# Altium PCB NB3000XN.PcbDoc (part 3 of 71)
Units mil, origin at the board's own origin, x right, y up, seen from the top; angles counter-clockwise.
Board outline 9527.56 x 6929.77 mil, 6 copper layers (Top Layer, GND+SHIELD, MidLayer1, MidLayer2, P2 - 3V3+5V0, Bottom Layer), stack 62.375 mil thick; 832 components, 1027 nets, 4655 pads, 4981 vias.
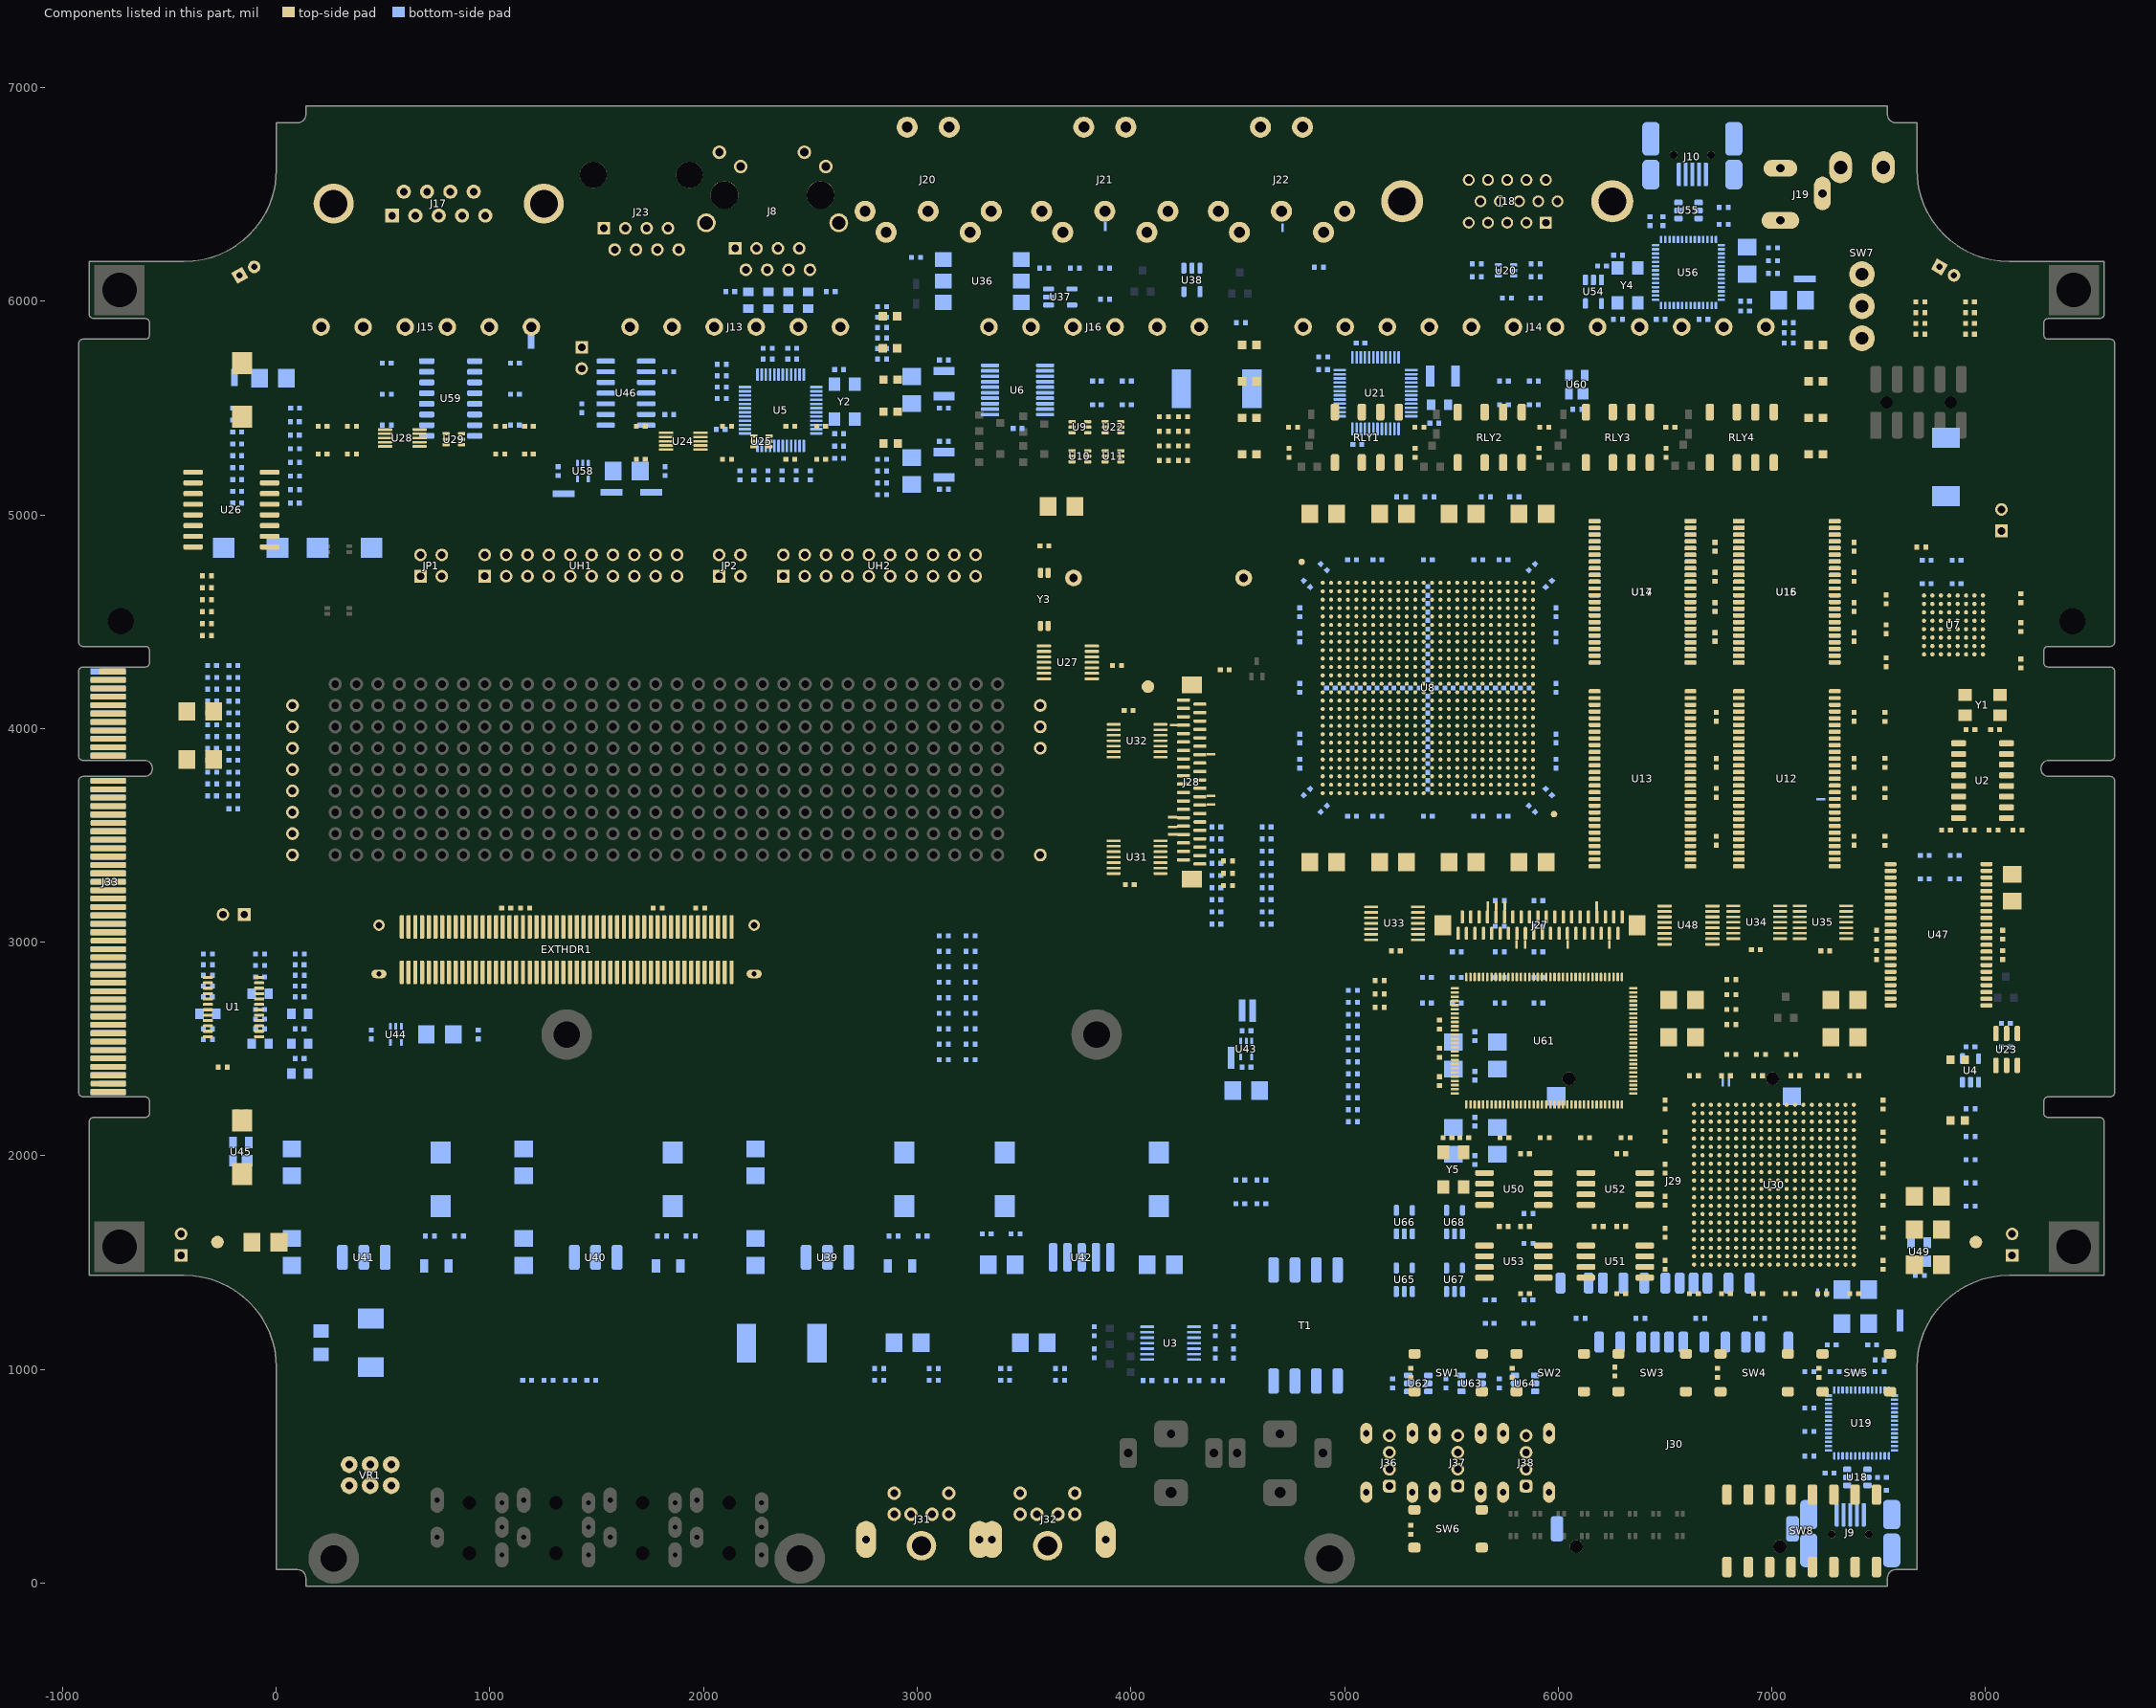
[diagram p7: the components of this part, seen from the top]

## Components (designator, comment, footprint, x,y, rotation, side; value= is the part's Value field where it differs from the comment) (continued)
R228 "100R 1%" RESC1005-STAR 3125,2812.5 r180 bottom locked (schematic designator R13)
R229 "100R 1%" RESC1005-STAR 3125,2667.5 r180 bottom locked (schematic designator R14)
R230 "100R 1%" RESC1005-STAR 3125,2522.5 r180 bottom locked (schematic designator R15)
R231 "100R 1%" RESC1005-STAR 3125,2595 r180 bottom locked (schematic designator R16)
R232 "4K7 1%" RESC1005-STAR 3250,2450 r0 bottom locked (schematic designator R17)
R233 "100R 1%" RESC1005-STAR 3125,2450 r180 bottom locked (schematic designator R18)
R234 "2K2 1%" RESC1005-STAR 1165,3160 r180 top (schematic designator R1)
R235 "2K2 1%" RESC1005-STAR 7530,3474.85 r270 top locked (schematic designator R275)
R236 "4K7 1%" RESC1005-STAR 5040,2719.09 r180 bottom locked (schematic designator R8)
R237 "4K7 1%" RESC1005-STAR 5040,2663.18 r180 bottom locked (schematic designator R7)
R238 "4K7 1%" RESC1005-STAR 5040,2607.27 r180 bottom locked (schematic designator R6)
R239 "4K7 1%" RESC1005-STAR 5040,2551.36 r180 bottom locked (schematic designator R5)
R240 "4K7 1%" RESC1005-STAR 5040,2495.45 r180 bottom locked (schematic designator R4)
R241 "4K7 1%" RESC1005-STAR 5040,2439.55 r180 bottom locked (schematic designator R3)
R242 "4K7 1%" RESC1005-STAR 5040,2383.64 r180 bottom locked (schematic designator R2)
R243 "4K7 1%" RESC1005-STAR 5040,2327.73 r180 bottom locked (schematic designator R1)
R244 "27R 1%" RESC1005-STAR 6280,5915 r180 bottom locked (schematic designator R1)
R245 "2K7 1%" RESC1005-STAR 7080,5805 r180 bottom locked (schematic designator R2)
R246 "5K6 1%" RESC1005-STAR 7080,5852.5 r180 bottom locked (schematic designator R3)
R247 "10K 1%" RESC1005-STAR 6775,6440 r180 bottom locked (schematic designator R4)
R248 "4K7 1%" RESC1005-STAR 7692.5,1440 r180 bottom locked (schematic designator R1000)
R249 "27R 1%" RESC1005-STAR 6775,6360 r180 bottom locked (schematic designator R6)
R250 "4K7 1%" RESC1005-STAR 7005,6250 r180 bottom locked (schematic designator R9)
R251 "4K7 1%" RESC1005-STAR 7005,6130 r180 bottom locked (schematic designator R8)
R252 "4K7 1%" RESC1005-STAR 7005,6190 r0 bottom locked (schematic designator R7)
R253 "4K7 1%" RESC1005-STAR 6665,1240 r180 bottom locked (schematic designator R1)
R254 "4K7 1%" RESC1005-STAR 6105,1240 r180 bottom locked (schematic designator R2)
R255 "4K7 1%" RESC1005-STAR 6385,1240 r0 bottom locked (schematic designator R1)
R256 "4K7 1%" RESC1005-STAR 6945,1240 r0 bottom locked (schematic designator R2)
R257 "12K 1%" RESC1005-STAR 5937.51,2085 r0 top locked (schematic designator R1)
R258 "12K 1%" RESC1005-STAR 6126.25,2085 r0 top locked (schematic designator R2)
R259 "12K 1%" RESC1005-STAR 6315,2085 r0 top locked (schematic designator R3)
R260 "10K 1%" RESC1005-STAR 5040,2775 r180 bottom locked (schematic designator R4)
R261 "150R 1%" RESC1005-STAR 5040,2271.82 r180 bottom locked (schematic designator R5)
R262 "150R 1%" RESC1005-STAR 5040,2215.91 r180 bottom locked (schematic designator R6)
R263 "150R 1%" RESC1005-STAR 5040,2160 r180 bottom locked (schematic designator R7)
R264 "2K2 1%" RESC1005-STAR 6810,2475 r0 top locked (schematic designator R269)
R265 "2K2 1%" RESC1005-STAR 6950,2475 r0 top locked (schematic designator R270)
R266 "2K2 1%" RESC1005-STAR 7090,2475 r0 top locked (schematic designator R271)
R267 "100R 1%" RESC1005-STAR 7926.99,5997 r0 top (schematic designator R154)
R268 "100R 1%" RESC1005-STAR 7695,5997 r0 top (schematic designator R155)
R269 "100R 1%" RESC1005-STAR 7926.99,5846 r0 top (schematic designator R156)
R270 "100R 1%" RESC1005-STAR 7695,5846 r0 top (schematic designator R157)
R271 "4K7 1%" RESC1005-STAR 6090,5495 r180 bottom locked (schematic designator R1000)
R272 "10K 1%" RESC1005-STAR 5445,2482.51 r90 top locked (schematic designator R268)
R273 "10K 1%" RESC1005-STAR 5445,2615 r90 top locked (schematic designator R264)
R274 "10K 1%" RESC1005-STAR 5225,935 r270 bottom locked (schematic designator R265)
R275 "10K 1%" RESC1005-STAR 5475,935 r90 bottom locked (schematic designator R266)
R276 "10K 1%" RESC1005-STAR 5725,935 r270 bottom locked (schematic designator R267)
R277 "4K7 1%" RESC1005-STAR 1785.16,3160.02 r180 top
R278 "4K7 1%" RESC1005-STAR 1985.52,3160.03 r180 top
R279 "4K7 1%" RESC1005-STAR 7926.99,5946.67 r0 top
R280 "4K7 1%" RESC1005-STAR 7695,5946.67 r0 top
R281 "4K7 1%" RESC1005-STAR 7926.99,5896.33 r0 top
R282 "4K7 1%" RESC1005-STAR 7695,5896.33 r0 top
R283 "4K7 1%" RESC1005-STAR 1076.56,3160 r180 top
RLY1 "IMO3 - 5VDC" IM03GR 4955,5245 r270 top locked
RLY2 "IMO3 - 5VDC" IM03GR 5530,5245 r270 top locked (schematic designator RLY1)
RLY3 "IMO3 - 5VDC" IM03GR 6130,5245 r270 top locked (schematic designator RLY1)
RLY4 "IMO3 - 5VDC" IM03GR 6710,5245 r270 top locked (schematic designator RLY1)
SW1 "SPNO" SW_DTSM-61NT/R 5485,985.39 r0 top locked
SW2 "SPNO" SW_DTSM-61NT/R 5962.5,985.39 r0 top locked
SW3 "SPNO" SW_DTSM-61NT/R 6440,985.39 r0 top locked
SW4 "SPNO" SW_DTSM-61NT/R 6917.5,985 r0 top locked
SW5 "SPNO" SW_DTSM-61NT/R 7395,985 r0 top locked
SW6 "SPNO" SW_DTSM-61NT/R 5485,255 r180 top locked (schematic designator SW1)
SW7 "SPDT SUB" T8019L-TNQ 7422,6920 r0 bottom locked (schematic designator SW1)
SW8 "219-8LPST" 219-8LPST 7140,245 r90 top locked (schematic designator SW1)
T1 "PT4812" PT4812 4668,1466 r0 bottom locked
TP1 "GND" TESTPIN 76.12,4108.23 r180 top locked
TP2 "5V0" TESTPIN 76.12,4008.23 r180 top locked
TP3 "+B" TESTPIN 3576.12,3908.23 r0 top locked
TP4 "3V3" TESTPIN 76.12,3908.23 r180 top locked
TP5 "2V5" TESTPIN 76.12,3808.23 r180 top locked
TP6 "1V8" TESTPIN 76.12,3708.23 r180 top locked
TP7 "1V2" TESTPIN 76.12,3608.23 r180 top locked
TP8 "GND" TESTPIN 3576.12,4008.23 r0 top locked
TP9 "MIXER LEFT" TESTPIN 76.12,3508.23 r180 top locked (schematic designator TP1)
TP10 "MIXER RIGHT" TESTPIN 76.12,3408.23 r180 top locked (schematic designator TP2)
TP11 "32K768HZ" TESTPIN 3576.12,4108.23 r0 top locked (schematic designator TP1)
TP12 "VBATT" TESTPIN 3576.12,3408.23 r0 top locked (schematic designator TP15)
U1 "CS4270" TSSOP-24 -320,2835 r270 top locked
U2 "ICS307-02" SOIC127P600-16 7986.38,3756.34 r270 top locked (schematic designator U1)
U3 "74HCU04" TSSOP14 4295,1200 r180 bottom locked (schematic designator U1)
U4 "SN74LVC1G04DBV" SOT95P280-5 7930,2400 r180 bottom locked (schematic designator U1)
U5 "RTL8201CL" TSQFP50P900X900-48 2360.87,5490 r90 bottom locked (schematic designator U1)
U6 "SN74LVC244ADB" SOP65P780-20 3470,5585 r270 bottom locked (schematic designator U2)
U7 "S29GL128P11FFI010" BGA100P8X8-64 7850,4485 r180 top locked (schematic designator U1)
U8 "XC3S1400AN-4FG676C" BGA100P26X26-676 5390,4190 r0 top locked (schematic designator U1)
U9 "SMF05C" SC70_6L 3725,5436.18 r270 top locked (schematic designator U2)
U10 "SMF05C" SC70_6L 3725,5300 r270 top locked (schematic designator U2)
U11 "SMF05C" SC70_6L 3880,5300 r270 top locked (schematic designator U2)
U12 "SDRAM-16Mx16" TSOP80P1176-54 7070,3765 r270 top locked (schematic designator U1)
U13 "SDRAM-16Mx16" TSOP80P1176-54 6395,3765 r270 top locked (schematic designator U2)
U14 "SRAM-256Kx16" TSOP80P1176-44 6395,4640 r270 bottom locked (schematic designator U1_SM)
U15 "SRAM-256Kx16" TSOP80P1176-44 7070,4640 r270 bottom locked (schematic designator U1_SM)
U16 "SRAM-256Kx16" TSOP80P1176-44 7070,4640 r270 top locked (schematic designator U1)
U17 "SRAM-256Kx16" TSOP80P1176-44 6395,4640 r270 top locked (schematic designator U2)
U18 "NUP2201MR6T1G" TSOP95P275-6 7400,495 r90 bottom locked (schematic designator U2)
U19 "CY7C68001-56LFC" QFN50P800X800_HS-57 7420,750 r180 bottom locked (schematic designator U3)
U20 "SMF05C" SC70_6L 5792.17,6170 r270 bottom locked (schematic designator U1)
U21 "THS8134BCPHP" TSQFP50P900X900_HS-48 5145,5570 r180 bottom locked (schematic designator U1)
U22 "SMF05C" SC70_6L 3880,5436.18 r270 top locked (schematic designator U2)
U23 "DS2502P" DSO-C6-D4 8099,2498.01 r180 top locked (schematic designator U1)
U24 "ADC084S021" TSSOP50P490-10AN 1905,5345 r180 top locked (schematic designator U1)
U25 "SMF05C" SC70_6L 2235,5370 r270 top locked (schematic designator U2)
U26 "PT2300-S" SOIC127P1030-16N -210,5025 r0 top locked (schematic designator U1)
U27 "PCF2123TS" TSOP65P640-14AN 3705,4310 r0 top locked (schematic designator U5)
U28 "DAC084S085CIMM" TSSOP50P490-10AN 590,5360 r0 top locked (schematic designator U1)
U29 "SMF05C" SC70_6L 795,5380 r270 top locked (schematic designator U2)
U30 "XC3S400AN-4FGG400C" FGG400 7010,1865 r270 top locked (schematic designator U1)
U31 "74VHC04" TSSOP14 3920,3475 r0 top locked (schematic designator U1)
U32 "74VHC04" TSSOP14 3920,4020 r0 top locked (schematic designator U1)
U33 "74VHC04" TSSOP14 5125,3165 r0 top locked (schematic designator U1)
U34 "74VHC04" TSSOP14 6820,3170 r0 top locked (schematic designator U1)
U35 "74VHC04" TSSOP14 7130,3170 r0 top locked (schematic designator U1)
U36 "4N35S" H11L1SR2VM 3305,6095 r90 bottom locked (schematic designator U1)
U37 "SN74LVC1G04DBV" SOT95P280-5 3670,6020 r90 bottom locked (schematic designator U2)
U38 "SN74LVC1G04DBV" SOT95P280-5 4285.84,6100 r0 bottom locked (schematic designator U3)
U39 "AP1084KL" TO254P-3N 2580,1775 r90 bottom locked (schematic designator U1)
U40 "AP1084KL" TO254P-3N 1495,1775 r90 bottom locked (schematic designator U1)
U41 "AP1084KL" TO254P-3N 410,1775 r90 bottom locked (schematic designator U1)
U42 "NCP630A" TO-263-2 3770,1525 r180 bottom locked (schematic designator U1)
U43 "TC1017R-3.3VLTTR" SOT65P210X80-5N 4540,2500 r270 bottom locked (schematic designator U1)
U44 "TC1017R-3.3VLTTR" SOT65P210X80-5N 560,2568.37 r270 bottom locked (schematic designator U1)
U45 "MAX6315US26D1" SOT143 -165.45,2020 r180 bottom locked (schematic designator U2000)
U46 "ISL8491IB" SOIC127P600-14N 1637.05,5570.08 r180 bottom locked (schematic designator U1)
U47 "SRAM-256Kx16" TSOP80P1176-44 7780,3035 r270 top locked (schematic designator U1_SM)
U48 "XPT2046" TSOP65P640-16AN 6610,3080 r0 top locked (schematic designator U1)
U49 "MAX6315US26D1" SOT143 7689.55,1550 r180 bottom locked (schematic designator U1000)
U50 "M25P80-VMW6 8Mbit Serial Flash" SOIC8-200-BODY 5655,1920 r270 top locked (schematic designator U1)
U51 "M25P80-VMW6 8Mbit Serial Flash" SOIC8-200-BODY 6130,1580 r270 top locked (schematic designator U1)
U52 "M25P80-VMW6 8Mbit Serial Flash" SOIC8-200-BODY 6130,1920 r270 top locked (schematic designator U1)
U53 "M25P80-VMW6 8Mbit Serial Flash" SOIC8-200-BODY 5655,1580 r270 top locked (schematic designator U2)
U54 "SN74LVC1G04DBV" SOT95P280-5 6165,6045 r0 bottom locked (schematic designator U1)
U55 "NUP2201MR6T1G" TSOP95P275-6 6610,6425 r270 bottom locked (schematic designator U2)
U56 "CY7C68001-56LFC" QFN50P800X800_HS-57 6610,6135 r0 bottom locked (schematic designator U3)
U58 "TC1017R-3.3VLTTR" SOT65P210X80-5N 1435,5205 r270 bottom locked (schematic designator U1)
U59 "HIN232ACBNZ-T" SOIC127P600-16 816.8,5545.08 r270 bottom locked (schematic designator U45)
U60 "MAX6315US26D1" SOT143 6087.05,5610 r180 bottom locked (schematic designator U1000)
U61 "ISP1760" SOT425-1 5570,2240 r0 top locked (schematic designator U59)
U62 "NUP2201MR6T1G" TSOP95P275-6 5345,935 r270 bottom locked (schematic designator U60)
U63 "NUP2201MR6T1G" TSOP95P275-6 5595,935 r270 bottom locked (schematic designator U61)
U64 "NUP2201MR6T1G" TSOP95P275-6 5845,935 r270 bottom locked (schematic designator U62)
U65 "SN74LVC1G04DBV" SOT95P280-5 5280,1420 r180 bottom locked
U66 "SN74LVC1G04DBV" SOT95P280-5 5280,1690 r180 bottom locked
U67 "SN74LVC1G04DBV" SOT95P280-5 5515,1420 r180 bottom locked (schematic designator U65)
U68 "SN74LVC1G04DBV" SOT95P280-5 5515,1690 r180 bottom locked (schematic designator U66)
UH1 "2x10 HEADER" HDR2X10 976.12,4713.23 r0 top locked
UH2 "2x10 HEADER" HDR2X10 2373.76,4713.23 r0 top locked
VR1 "2x5K linear" POT-R0911G-A1 440,555 r180 bottom locked
Y1 "20MHZ" XTAL-200X126-4 7986.38,4110 r0 top locked
Y2 "25MHz" XTAL-200X126-4 2660,5530 r270 bottom locked (schematic designator Y1)
Y3 "32.768 kHz 7pF" ECS-71 3595,4605 r90 top locked (schematic designator Y1)
Y4 "24MHz" XTAL-200X126-4 6325,6075 r270 bottom locked (schematic designator Y1)
Y5 "12MHz XTAL" XTAL-200X126-4 5510,1935 r270 top locked (schematic designator Y1)

## Footprints (in the part's own frame and the unit in brackets; to place one, negate y for a bottom-side part, rotate by r counter-clockwise, add the part's x,y. Pads: shape width x height; smd on the part's side, far side on the other; paste and mask are expansions set on the pad)
219-8LPST [mm] "Surface Mount DIP Switch, 8-way, Gull Wing Leads"
  rrect50% 2.44x1.13 smd: 1(-4.3,8.89) 2(-4.3,6.35) 3(-4.3,3.81) 4(-4.3,1.27) 5(-4.3,-1.27) 6(-4.3,-3.81) 7(-4.3,-6.35) 8(-4.3,-8.89) 9(4.3,-8.89) 10(4.3,-6.35) 11(4.3,-3.81) 12(4.3,-1.27) 13(4.3,1.27) 14(4.3,3.81) 15(4.3,6.35) 16(4.3,8.89)
  silkscreen extent -4.42,-11.04 2.68,11.04, body extent -5.1,-11.4 5.08,11.4, height 3.37
0603LED_GREEN [mm]
  rect 1x1 smd paste+0 mask+0: 1(0.85,0) 2(-0.85,0)
  silkscreen extent -1.97,-0.85 1.6,0.85, body extent -0.92,-0.53 1.09,0.53, height 0.46
0603LED_ORANGE [mm]
  rect 1x1 smd paste+0 mask+0: 1(0.85,0) 2(-0.85,0)
  silkscreen extent -1.97,-0.85 1.6,0.85, body extent -0.92,-0.53 1.09,0.53, height 0.46
0603LED_RED [mm]
  rect 1x1 smd paste+0 mask+0: 1(0.85,0) 2(-0.85,0)
  silkscreen extent -1.97,-0.85 1.6,0.85, body extent -0.92,-0.53 1.09,0.53, height 0.46
0603LED_YELLOW [mm]
  rect 1x1 smd paste+0 mask+0: 1(0.85,0) 2(-0.85,0)
  silkscreen extent -1.97,-0.85 1.6,0.85, body extent -0.92,-0.53 1.09,0.53, height 0.46
53751 [mm]
  rrect50% 0.508x2.8 smd: 1(-19.6,-2.7) 2(-19.6,2.7) 3(-18.8,-2.7) 4(-18.8,2.7) 5(-18,-2.7) 6(-18,2.7) 7(-17.2,-2.7) 8(-17.2,2.7) 9(-16.4,-2.7) 10(-16.4,2.7) 11(-15.6,-2.7) 12(-15.6,2.7) 13(-14.8,-2.7) 14(-14.8,2.7) 15(-14,-2.7) 16(-14,2.7) 17(-13.2,-2.7) 18(-13.2,2.7) 19(-12.4,-2.7) 20(-12.4,2.7) 21(-11.6,-2.7) 22(-11.6,2.7) 23(-10.8,-2.7) 24(-10.8,2.7) 25(-10,-2.7) 26(-10,2.7) 27(-9.2,-2.7) 28(-9.2,2.7) 29(-8.4,-2.7) 30(-8.4,2.7) 31(-7.6,-2.7) 32(-7.6,2.7) 33(-6.8,-2.7) 34(-6.8,2.7) 35(-6,-2.7) 36(-6,2.7) 37(-5.2,-2.7) 38(-5.2,2.7) 39(-4.4,-2.7) 40(-4.4,2.7) 41(-3.6,-2.7) 42(-3.6,2.7) 43(-2.8,-2.7) 44(-2.8,2.7) 45(-2,-2.7) 46(-2,2.7) 47(-1.2,-2.7) 48(-1.2,2.7) 49(-0.4,-2.7) 50(-0.4,2.7) 51(0.4,-2.7) 52(0.4,2.7) 53(1.2,-2.7) 54(1.2,2.7) 55(2,-2.7) 56(2,2.7) 57(2.8,-2.7) 58(2.8,2.7) 59(3.6,-2.7) 60(3.6,2.7) 61(4.4,-2.7) 62(4.4,2.7) 63(5.2,-2.7) 64(5.2,2.7) 65(6,-2.7) 66(6,2.7) 67(6.8,-2.7) 68(6.8,2.7) 69(7.6,-2.7) 70(7.6,2.7) 71(8.4,-2.7) 72(8.4,2.7) 73(9.2,-2.7) 74(9.2,2.7) 75(10,-2.7) 76(10,2.7) 77(10.8,-2.7) 78(10.8,2.7) 79(11.6,-2.7) 80(11.6,2.7) 81(12.4,-2.7) 82(12.4,2.7) 83(13.2,-2.7) 84(13.2,2.7) 85(14,-2.7) 86(14,2.7) 87(14.8,-2.7) 88(14.8,2.7) 89(15.6,-2.7) 90(15.6,2.7) 91(16.4,-2.7) 92(16.4,2.7) 93(17.2,-2.7) 94(17.2,2.7) 95(18,-2.7) 96(18,2.7) 97(18.8,-2.7) 98(18.8,2.7) 99(19.6,-2.7) 100(19.6,2.7)
  round 1.35 hole 0.8: MH1(-22.283,-2.9) MH3(22.317,-2.9)
  oval 1.8x1 hole 0.6 slot 1.4 at 0 deg: MH2(-22.283,2.9) MH4(22.317,2.9)
  silkscreen extent -30,-4.77 30.05,4.5, body extent -30.33,-4.4 30.37,4.4, height 11.7
482040001 [mm] "USB A Type Up-Right Reverse Connector, Pb-Free version"
  rrect50% 1.52x1.52 hole 0.9: 1(0,7.73)
  round 1.52 hole 0.9: 2(0,9.73) 3(0,11.73) 4(0,13.73)
  oval 1.4x2.5 hole 0.75 slot 1.5 at 90 deg: MH1(-2.735,7) MH2(2.735,7) MH3(-2.735,14) MH4(2.735,14)
  silkscreen extent -3.6,-4.64 3.6,15.75, body extent -3.61,-4.71 3.59,14.54, height 14.68
955012881 [mm] "Connector; PCB Jack, Thru-Hole; 1-Port, 8 Positions, 8 Loaded; Shielded without Lightpipes; Vertical"
  rect 1.5x1.5 hole 0.9: 1(-4.445,3.43)
  round 1.5 hole 0.9: 2(-3.175,5.97) 3(-1.905,3.43) 4(-0.635,5.97) 5(0.635,3.43) 6(1.905,5.97) 7(3.175,3.43) 8(4.445,5.97)
  round 3.15 hole 3.15 unplated: MH1(-5.715,-2.92) MH2(5.715,-2.92)
  silkscreen extent -7.62,-10.8 7.62,7.3, body extent -7.53,-145.72 7.51,7.04, height 23.16
BGA100P8X8-64 [mil] "AMD 64-Ball Fortfied Ball grid Array (FBGA)"
  round 20 smd: A1(-137.8,-137.8) A2(-137.8,-98.43) A3(-137.8,-59.06) A4(-137.8,-19.68) A5(-137.8,19.68) A6(-137.8,59.06) A7(-137.8,98.43) A8(-137.8,137.8) B1(-98.43,-137.8) B2(-98.43,-98.43) B3(-98.43,-59.06) B4(-98.43,-19.69) B5(-98.43,19.68) B6(-98.43,59.06) B7(-98.43,98.43) B8(-98.43,137.8) C1(-59.06,-137.8) C2(-59.06,-98.43) C3(-59.06,-59.06) C4(-59.06,-19.69) C5(-59.06,19.68) C6(-59.06,59.06) C7(-59.06,98.43) C8(-59.06,137.8) D1(-19.69,-137.8) D2(-19.69,-98.43) D3(-19.69,-59.06) D4(-19.69,-19.69) D5(-19.69,19.68) D6(-19.69,59.06) D7(-19.69,98.43) D8(-19.69,137.8) E1(19.68,-137.8) E2(19.68,-98.43) E3(19.68,-59.06) E4(19.68,-19.69) E5(19.68,19.68) E6(19.68,59.06) E7(19.68,98.43) E8(19.68,137.8) F1(59.05,-137.8) F2(59.05,-98.43) F3(59.05,-59.06) F4(59.05,-19.69) F5(59.05,19.68) F6(59.05,59.06) F7(59.05,98.43) F8(59.05,137.8) G1(98.42,-137.8) G2(98.42,-98.43) G3(98.42,-59.06) G4(98.42,-19.69) G5(98.42,19.68) G6(98.42,59.06) G7(98.43,98.43) G8(98.42,137.8) H1(137.8,-137.8) H2(137.8,-98.43) H3(137.8,-59.06) H4(137.8,-19.69) H5(137.8,19.68) H6(137.8,59.06) H7(137.8,98.43) H8(137.8,137.8)
  silkscreen extent -256,-250 256,217, body extent -250,-213 252,211, height 39
BGA100P26X26-676 [mm]
  round 0.483 smd: A1(-12.5,12.5) A2(-11.5,12.5) A3(-10.5,12.5) A4(-9.5,12.5) A5(-8.5,12.5) A6(-7.5,12.5) A7(-6.5,12.5) A8(-5.5,12.5) A9(-4.5,12.5) A10(-3.5,12.5) A11(-2.5,12.5) A12(-1.5,12.5) A13(-0.5,12.5) A14(0.5,12.5) A15(1.5,12.5) A16(2.5,12.5) A17(3.5,12.5) A18(4.5,12.5) A19(5.5,12.5) A20(6.5,12.5) A21(7.5,12.5) A22(8.5,12.5) A23(9.5,12.5) A24(10.5,12.5) A25(11.5,12.5) A26(12.5,12.5) AA1(-12.5,-7.5) AA2(-11.5,-7.5) AA3(-10.5,-7.5) AA4(-9.5,-7.5) AA5(-8.5,-7.5) AA6(-7.5,-7.5) AA7(-6.5,-7.5) AA8(-5.5,-7.5) AA9(-4.5,-7.5) AA10(-3.5,-7.5) AA11(-2.5,-7.5) AA12(-1.5,-7.5) AA13(-0.5,-7.5) AA14(0.5,-7.5) AA15(1.5,-7.5) AA16(2.5,-7.5) AA17(3.5,-7.5) AA18(4.5,-7.5) AA19(5.5,-7.5) AA20(6.5,-7.5) AA21(7.5,-7.5) AA22(8.5,-7.5) AA23(9.5,-7.5) AA24(10.5,-7.5) AA25(11.5,-7.5) AA26(12.5,-7.5) AB1(-12.5,-8.5) AB2(-11.5,-8.5) AB3(-10.5,-8.5) AB4(-9.5,-8.5) AB5(-8.5,-8.5) AB6(-7.5,-8.5) AB7(-6.5,-8.5) AB8(-5.5,-8.5) AB9(-4.5,-8.5) AB10(-3.5,-8.5) AB11(-2.5,-8.5) AB12(-1.5,-8.5) AB13(-0.5,-8.5) AB14(0.5,-8.5) AB15(1.5,-8.5) AB16(2.5,-8.5) AB17(3.5,-8.5) AB18(4.5,-8.5) AB19(5.5,-8.5) AB20(6.5,-8.5) AB21(7.5,-8.5) AB22(8.5,-8.5) AB23(9.5,-8.5) AB24(10.5,-8.5) AB25(11.5,-8.5) AB26(12.5,-8.5) AC1(-12.5,-9.5) AC2(-11.5,-9.5) AC3(-10.5,-9.5) AC4(-9.5,-9.5) AC5(-8.5,-9.5) AC6(-7.5,-9.5) AC7(-6.5,-9.5) AC8(-5.5,-9.5) AC9(-4.5,-9.5) AC10(-3.5,-9.5) AC11(-2.5,-9.5) AC12(-1.5,-9.5) AC13(-0.5,-9.5) AC14(0.5,-9.5) AC15(1.5,-9.5) AC16(2.5,-9.5) AC17(3.5,-9.5) AC18(4.5,-9.5) AC19(5.5,-9.5) AC20(6.5,-9.5) AC21(7.5,-9.5) AC22(8.5,-9.5) AC23(9.5,-9.5) AC24(10.5,-9.5) AC25(11.5,-9.5) AC26(12.5,-9.5) AD1(-12.5,-10.5) AD2(-11.5,-10.5) AD3(-10.5,-10.5) AD4(-9.5,-10.5) AD5(-8.5,-10.5) AD6(-7.5,-10.5) AD7(-6.5,-10.5) AD8(-5.5,-10.5) AD9(-4.5,-10.5) AD10(-3.5,-10.5) AD11(-2.5,-10.5) AD12(-1.5,-10.5) AD13(-0.5,-10.5) AD14(0.5,-10.5) AD15(1.5,-10.5) AD16(2.5,-10.5) AD17(3.5,-10.5) AD18(4.5,-10.5) AD19(5.5,-10.5) AD20(6.5,-10.5) AD21(7.5,-10.5) AD22(8.5,-10.5) AD23(9.5,-10.5) AD24(10.5,-10.5) AD25(11.5,-10.5) AD26(12.5,-10.5) AE1(-12.5,-11.5) AE2(-11.5,-11.5) AE3(-10.5,-11.5) AE4(-9.5,-11.5) AE5(-8.5,-11.5) AE6(-7.5,-11.5) AE7(-6.5,-11.5) AE8(-5.5,-11.5) AE9(-4.5,-11.5) AE10(-3.5,-11.5) AE11(-2.5,-11.5) AE12(-1.5,-11.5) AE13(-0.5,-11.5) AE14(0.5,-11.5) AE15(1.5,-11.5) AE16(2.5,-11.5) AE17(3.5,-11.5) AE18(4.5,-11.5) AE19(5.5,-11.5) AE20(6.5,-11.5) AE21(7.5,-11.5) AE22(8.5,-11.5) AE23(9.5,-11.5) AE24(10.5,-11.5) AE25(11.5,-11.5) AE26(12.5,-11.5) AF1(-12.5,-12.5) AF2(-11.5,-12.5) AF3(-10.5,-12.5) AF4(-9.5,-12.5) AF5(-8.5,-12.5) AF6(-7.5,-12.5) AF7(-6.5,-12.5) AF8(-5.5,-12.5) AF9(-4.5,-12.5) AF10(-3.5,-12.5) AF11(-2.5,-12.5) AF12(-1.5,-12.5) AF13(-0.5,-12.5) AF14(0.5,-12.5) AF15(1.5,-12.5) AF16(2.5,-12.5) AF17(3.5,-12.5) AF18(4.5,-12.5) AF19(5.5,-12.5) AF20(6.5,-12.5) AF21(7.5,-12.5) AF22(8.5,-12.5) AF23(9.5,-12.5) AF24(10.5,-12.5) AF25(11.5,-12.5) AF26(12.5,-12.5) B1(-12.5,11.5) B2(-11.5,11.5) B3(-10.5,11.5) B4(-9.5,11.5) B5(-8.5,11.5) B6(-7.5,11.5) B7(-6.5,11.5) B8(-5.5,11.5) B9(-4.5,11.5) B10(-3.5,11.5) B11(-2.5,11.5) B12(-1.5,11.5) B13(-0.5,11.5) B14(0.5,11.5) B15(1.5,11.5) B16(2.5,11.5) B17(3.5,11.5) B18(4.5,11.5) B19(5.5,11.5) B20(6.5,11.5) B21(7.5,11.5) B22(8.5,11.5) B23(9.5,11.5) B24(10.5,11.5) B25(11.5,11.5) B26(12.5,11.5) C1(-12.5,10.5) C2(-11.5,10.5) C3(-10.5,10.5) C4(-9.5,10.5) C5(-8.5,10.5) C6(-7.5,10.5) C7(-6.5,10.5) C8(-5.5,10.5) C9(-4.5,10.5) C10(-3.5,10.5) C11(-2.5,10.5) C12(-1.5,10.5) C13(-0.5,10.5) C14(0.5,10.5) C15(1.5,10.5) C16(2.5,10.5) C17(3.5,10.5) C18(4.5,10.5) C19(5.5,10.5) C20(6.5,10.5) C21(7.5,10.5) C22(8.5,10.5) C23(9.5,10.5) C24(10.5,10.5) C25(11.5,10.5) C26(12.5,10.5) D1(-12.5,9.5) D2(-11.5,9.5) D3(-10.5,9.5) D4(-9.5,9.5) D5(-8.5,9.5) D6(-7.5,9.5) D7(-6.5,9.5) D8(-5.5,9.5) D9(-4.5,9.5) D10(-3.5,9.5) D11(-2.5,9.5) D12(-1.5,9.5) D13(-0.5,9.5) D14(0.5,9.5) D15(1.5,9.5) D16(2.5,9.5) D17(3.5,9.5) D18(4.5,9.5) D19(5.5,9.5) D20(6.5,9.5) D21(7.5,9.5) D22(8.5,9.5) D23(9.5,9.5) D24(10.5,9.5) D25(11.5,9.5) D26(12.5,9.5) E1(-12.5,8.5) E2(-11.5,8.5) E3(-10.5,8.5) E4(-9.5,8.5) E5(-8.5,8.5) E6(-7.5,8.5) E7(-6.5,8.5) E8(-5.5,8.5) E9(-4.5,8.5) E10(-3.5,8.5) E11(-2.5,8.5) E12(-1.5,8.5) E13(-0.5,8.5) E14(0.5,8.5) E15(1.5,8.5) E16(2.5,8.5) E17(3.5,8.5) E18(4.5,8.5) E19(5.5,8.5) E20(6.5,8.5) E21(7.5,8.5) E22(8.5,8.5) E23(9.5,8.5) E24(10.5,8.5) E25(11.5,8.5) E26(12.5,8.5) F1(-12.5,7.5) F2(-11.5,7.5) F3(-10.5,7.5) F4(-9.5,7.5) F5(-8.5,7.5) F6(-7.5,7.5) F7(-6.5,7.5) F8(-5.5,7.5) F9(-4.5,7.5) F10(-3.5,7.5) F11(-2.5,7.5) F12(-1.5,7.5) F13(-0.5,7.5) F14(0.5,7.5) F15(1.5,7.5) F16(2.5,7.5) F17(3.5,7.5) F18(4.5,7.5) F19(5.5,7.5) F20(6.5,7.5) F21(7.5,7.5) F22(8.5,7.5) F23(9.5,7.5) F24(10.5,7.5) F25(11.5,7.5) F26(12.5,7.5) G1(-12.5,6.5) G2(-11.5,6.5) G3(-10.5,6.5) G4(-9.5,6.5) G5(-8.5,6.5) G6(-7.5,6.5) G7(-6.5,6.5) G8(-5.5,6.5) G9(-4.5,6.5) G10(-3.5,6.5) G11(-2.5,6.5) G12(-1.5,6.5) G13(-0.5,6.5) G14(0.5,6.5) G15(1.5,6.5) G16(2.5,6.5) G17(3.5,6.5) G18(4.5,6.5) G19(5.5,6.5) G20(6.5,6.5) G21(7.5,6.5) G22(8.5,6.5) G23(9.5,6.5) G24(10.5,6.5) G25(11.5,6.5) G26(12.5,6.5) H1(-12.5,5.5) H2(-11.5,5.5) H3(-10.5,5.5) H4(-9.5,5.5) H5(-8.5,5.5) H6(-7.5,5.5) H7(-6.5,5.5) H8(-5.5,5.5) H9(-4.5,5.5) H10(-3.5,5.5) H11(-2.5,5.5) H12(-1.5,5.5) H13(-0.5,5.5) H14(0.5,5.5) H15(1.5,5.5) H16(2.5,5.5) H17(3.5,5.5) H18(4.5,5.5) H19(5.5,5.5) H20(6.5,5.5) H21(7.5,5.5) H22(8.5,5.5) H23(9.5,5.5) H24(10.5,5.5) H25(11.5,5.5) H26(12.5,5.5) J1(-12.5,4.5) J2(-11.5,4.5) J3(-10.5,4.5) J4(-9.5,4.5) J5(-8.5,4.5) J6(-7.5,4.5) J7(-6.5,4.5) J8(-5.5,4.5) J9(-4.5,4.5) J10(-3.5,4.5) J11(-2.5,4.5) J12(-1.5,4.5) J13(-0.5,4.5) J14(0.5,4.5) J15(1.5,4.5) J16(2.5,4.5) J17(3.5,4.5) J18(4.5,4.5) J19(5.5,4.5) J20(6.5,4.5) J21(7.5,4.5) J22(8.5,4.5) J23(9.5,4.5) J24(10.5,4.5) J25(11.5,4.5) J26(12.5,4.5) K1(-12.5,3.5) K2(-11.5,3.5) K3(-10.5,3.5) K4(-9.5,3.5) K5(-8.5,3.5) K6(-7.5,3.5) K7(-6.5,3.5) K8(-5.5,3.5) K9(-4.5,3.5) K10(-3.5,3.5) K11(-2.5,3.5) K12(-1.5,3.5) K13(-0.5,3.5) K14(0.5,3.5) K15(1.5,3.5) K16(2.5,3.5) K17(3.5,3.5) K18(4.5,3.5) K19(5.5,3.5) K20(6.5,3.5) K21(7.5,3.5) K22(8.5,3.5) K23(9.5,3.5) K24(10.5,3.5) K25(11.5,3.5) K26(12.5,3.5) L1(-12.5,2.5) L2(-11.5,2.5) L3(-10.5,2.5) L4(-9.5,2.5) L5(-8.5,2.5) L6(-7.5,2.5) L7(-6.5,2.5) L8(-5.5,2.5) L9(-4.5,2.5) L10(-3.5,2.5) L11(-2.5,2.5) L12(-1.5,2.5) L13(-0.5,2.5) L14(0.5,2.5) L15(1.5,2.5) L16(2.5,2.5) L17(3.5,2.5) L18(4.5,2.5) L19(5.5,2.5) L20(6.5,2.5) L21(7.5,2.5) L22(8.5,2.5) L23(9.5,2.5) L24(10.5,2.5) L25(11.5,2.5) L26(12.5,2.5) M1(-12.5,1.5) M2(-11.5,1.5) M3(-10.5,1.5) M4(-9.5,1.5) M5(-8.5,1.5) M6(-7.5,1.5) M7(-6.5,1.5) M8(-5.5,1.5) M9(-4.5,1.5) M10(-3.5,1.5) M11(-2.5,1.5) M12(-1.5,1.5) M13(-0.5,1.5) M14(0.5,1.5) M15(1.5,1.5) M16(2.5,1.5) M17(3.5,1.5) M18(4.5,1.5) M19(5.5,1.5) M20(6.5,1.5) M21(7.5,1.5) M22(8.5,1.5) M23(9.5,1.5) M24(10.5,1.5) M25(11.5,1.5) M26(12.5,1.5) N1(-12.5,0.5) N2(-11.5,0.5) N3(-10.5,0.5) N4(-9.5,0.5) N5(-8.5,0.5) N6(-7.5,0.5) N7(-6.5,0.5) N8(-5.5,0.5) N9(-4.5,0.5) N10(-3.5,0.5) N11(-2.5,0.5) N12(-1.5,0.5) N13(-0.5,0.5) N14(0.5,0.5) N15(1.5,0.5) N16(2.5,0.5) N17(3.5,0.5) N18(4.5,0.5) N19(5.5,0.5) N20(6.5,0.5) N21(7.5,0.5) N22(8.5,0.5) N23(9.5,0.5) N24(10.5,0.5) N25(11.5,0.5) N26(12.5,0.5) P1(-12.5,-0.5) P2(-11.5,-0.5) P3(-10.5,-0.5) P4(-9.5,-0.5) P5(-8.5,-0.5) P6(-7.5,-0.5) P7(-6.5,-0.5) P8(-5.5,-0.5) P9(-4.5,-0.5) P10(-3.5,-0.5) P11(-2.5,-0.5) P12(-1.5,-0.5) P13(-0.5,-0.5) P14(0.5,-0.5) P15(1.5,-0.5) P16(2.5,-0.5) P17(3.5,-0.5) P18(4.5,-0.5) P19(5.5,-0.5) P20(6.5,-0.5) P21(7.5,-0.5) P22(8.5,-0.5) P23(9.5,-0.5) P24(10.5,-0.5) P25(11.5,-0.5) P26(12.5,-0.5) R1(-12.5,-1.5) R2(-11.5,-1.5) R3(-10.5,-1.5) R4(-9.5,-1.5) R5(-8.5,-1.5) R6(-7.5,-1.5) R7(-6.5,-1.5) R8(-5.5,-1.5) R9(-4.5,-1.5) R10(-3.5,-1.5) R11(-2.5,-1.5) R12(-1.5,-1.5) R13(-0.5,-1.5) R14(0.5,-1.5) R15(1.5,-1.5) R16(2.5,-1.5) R17(3.5,-1.5) R18(4.5,-1.5) R19(5.5,-1.5) R20(6.5,-1.5) R21(7.5,-1.5) R22(8.5,-1.5) R23(9.5,-1.5) R24(10.5,-1.5) R25(11.5,-1.5) R26(12.5,-1.5) T1(-12.5,-2.5) T2(-11.5,-2.5) T3(-10.5,-2.5) T4(-9.5,-2.5) T5(-8.5,-2.5) T6(-7.5,-2.5) T7(-6.5,-2.5) T8(-5.5,-2.5) T9(-4.5,-2.5) T10(-3.5,-2.5) T11(-2.5,-2.5) T12(-1.5,-2.5) T13(-0.5,-2.5) T14(0.5,-2.5) T15(1.5,-2.5) T16(2.5,-2.5) T17(3.5,-2.5) T18(4.5,-2.5) T19(5.5,-2.5) T20(6.5,-2.5) T21(7.5,-2.5) T22(8.5,-2.5) T23(9.5,-2.5) T24(10.5,-2.5) T25(11.5,-2.5) T26(12.5,-2.5) U1(-12.5,-3.5) U2(-11.5,-3.5) U3(-10.5,-3.5) U4(-9.5,-3.5) U5(-8.5,-3.5) U6(-7.5,-3.5) U7(-6.5,-3.5) U8(-5.5,-3.5) U9(-4.5,-3.5) U10(-3.5,-3.5) U11(-2.5,-3.5) U12(-1.5,-3.5) U13(-0.5,-3.5) U14(0.5,-3.5) U15(1.5,-3.5) U16(2.5,-3.5) U17(3.5,-3.5) U18(4.5,-3.5) U19(5.5,-3.5) U20(6.5,-3.5) U21(7.5,-3.5) U22(8.5,-3.5) U23(9.5,-3.5) U24(10.5,-3.5) U25(11.5,-3.5) U26(12.5,-3.5) V1(-12.5,-4.5) V2(-11.5,-4.5) V3(-10.5,-4.5) V4(-9.5,-4.5) V5(-8.5,-4.5) V6(-7.5,-4.5) V7(-6.5,-4.5) V8(-5.5,-4.5) V9(-4.5,-4.5) V10(-3.5,-4.5) V11(-2.5,-4.5) V12(-1.5,-4.5) V13(-0.5,-4.5) V14(0.5,-4.5) V15(1.5,-4.5) V16(2.5,-4.5) V17(3.5,-4.5) V18(4.5,-4.5) V19(5.5,-4.5) V20(6.5,-4.5) V21(7.5,-4.5) V22(8.5,-4.5) V23(9.5,-4.5) V24(10.5,-4.5) V25(11.5,-4.5) V26(12.5,-4.5) W1(-12.5,-5.5) W2(-11.5,-5.5) W3(-10.5,-5.5) W4(-9.5,-5.5) W5(-8.5,-5.5) W6(-7.5,-5.5) W7(-6.5,-5.5) W8(-5.5,-5.5) W9(-4.5,-5.5) W10(-3.5,-5.5) W11(-2.5,-5.5) W12(-1.5,-5.5) W13(-0.5,-5.5) W14(0.5,-5.5) W15(1.5,-5.5) W16(2.5,-5.5) W17(3.5,-5.5) W18(4.5,-5.5) W19(5.5,-5.5) W20(6.5,-5.5) W21(7.5,-5.5) W22(8.5,-5.5) W23(9.5,-5.5) W24(10.5,-5.5) W25(11.5,-5.5) W26(12.5,-5.5) Y1(-12.5,-6.5) Y2(-11.5,-6.5) Y3(-10.5,-6.5) Y4(-9.5,-6.5) Y5(-8.5,-6.5) Y6(-7.5,-6.5) Y7(-6.5,-6.5) Y8(-5.5,-6.5) Y9(-4.5,-6.5) Y10(-3.5,-6.5) Y11(-2.5,-6.5) Y12(-1.5,-6.5) Y13(-0.5,-6.5) Y14(0.5,-6.5) Y15(1.5,-6.5) Y16(2.5,-6.5) Y17(3.5,-6.5) Y18(4.5,-6.5) Y19(5.5,-6.5) Y20(6.5,-6.5) Y21(7.5,-6.5) Y22(8.5,-6.5) Y23(9.5,-6.5) Y24(10.5,-6.5) Y25(11.5,-6.5) Y26(12.5,-6.5)
  round 0.762 smd paste-0.762 mask+0.711: FID1(-15,15) FID1(15,-15)
  round 1 on Mech7 paste-0.55 mask+1: FID1(-15,15) FID1(15,-15)
  Top Layer circle w0.2: c15,-15 r1
  Top Layer circle w0.2: c-15,15 r1
  silkscreen extent -14.77,-13.5 13.5,13.5, body extent -13.53,-13.5 13.47,13.5, height 2.59
CAPC1005-STAR#1 [mm] "Chip Capacitor 1005"
  rect 0.6x0.6 smd: 1(-0.525,0) 2(0.525,0)
  silkscreen extent -0.05,-0.38 0.05,0.38, body extent -0.57,-0.3 0.57,0.3, height 0.4
CAPC1005-STAR#2 [mm] "Chip Capacitor 1005"
  rect 0.6x0.6 smd mask+0.038: 1(-0.525,0) 2(0.525,0)
  silkscreen extent -0.05,-0.38 0.05,0.38, body extent -0.57,-0.3 0.57,0.3, height 0.2
CAPC2012-STAR [mm] "0805 Capacitor SMD - Startronics"
  rect 1x1.25 smd: 1(-1,0) 2(1,0)
  silkscreen extent -0.4,-1 0.4,1, body extent -0.98,-0.64 0.87,0.6, height 0.8
CAPC3216-STAR [mm] "Capacitor 1206 (3216) for Startronics"
  rect 1x1.6 smd: 1(-1.45,0) 2(1.45,0)
  silkscreen extent -0.62,-1.1 0.62,1.1, body extent -1.64,-0.89 1.63,0.86, height 0.9
CAPC3528-STAR#1 [mm] "Capacitor 3.5x2.8mm (B-Case)"
  rect 2x2.2 smd: 1(-1.6,0) 2(1.6,0)
  silkscreen extent -3,-1.7 3.05,1.7, body extent -1.79,-1.54 1.8,1.54, height 1
CAPC3528-STAR#2 [mm] "Capacitor 3.5x2.8mm (B-Case)"
  rect 2x2.2 smd: 1(-1.6,0)
  rect 1.956x2.2 smd: 2(1.6,0)
  silkscreen extent -3,-1.7 3.05,1.7, body extent -1.79,-1.54 1.8,1.54, height 1
CAPC7343-STAR [mm] "Capcacitor SMD 7.3 x 4.3mm (D-Case)"
  rect 2.6x2.4 smd: 1(-3.202,0.007) 2(3.198,0.007)
  silkscreen extent -5.33,-2.39 5.08,2.41, body extent -3.49,-2.03 3.51,2.04, height 4.05
CAPM7163 [mm]
  rect 2.35x3.1 smd: 1(-2.875,0) 2(2.875,0)
  silkscreen extent -3.5,-3.15 3.5,3.15, body extent -3.1,-2.64 3.2,2.81, height 1.5
CELL_HOLDER [mm] "Lithium Battery Holder for CR2032 3V Cell"
  round 2 hole 1: 1(12.275,0) 2(-7.95,0)
  Top Layer region: -6.475,-3.6 -3.95,-3.6 -3.95,3.6 -6.475,3.6
  Top Layer region: -3.941,1.527 -3.941,3.602 -8.09,3.602 -8.09,1.527
  Top Layer region: -8.109,-1.527 -8.109,-3.602 -3.959,-3.602 -3.959,-1.527
  Top Layer region: 12.298,1.534 12.298,3.609 9.573,3.609 9.573,1.534
  Top Layer region: 9.577,-1.534 9.577,-3.609 12.302,-3.609 12.302,-1.534
  Top Layer region: 10.802,3.591 9.577,3.591 9.577,-3.609 10.802,-3.609
  silkscreen extent -10.6,-10.6 13.47,10.6, body extent -10.62,-10.59 13.17,10.63, height 10
CON_RJ45_RA_LEDS [mm]
  rect 1.5x1.5 hole 0.9: 1(-4.445,6.35)
  round 1.5 hole 0.9: 2(-3.175,8.89) 3(-1.905,6.35) 4(-0.635,8.89) 5(0.635,6.35) 6(1.905,8.89) 7(3.175,6.35) 8(4.445,8.89)
  round 1.62 hole 1: 9(-6.325,-5.08) 10(-3.785,-3.38) 11(3.785,-5.08) 12(6.325,-3.38)
  round 2.23 hole 1.6: MH1(-7.875,3.3) MH2(7.875,3.3)
  round 3.3 hole 3.3 unplated: MH3(-5.715,0) MH4(5.715,0)
  silkscreen extent -8,-10.7 8,10.6, body extent -7.9,-145.27 7.97,10.6, height 24.58
DB9_MALE [mm]
  rect 1.69x1.69 hole 0.9: 1(1.385,-2.84)
  round 1.69 hole 0.9: 2(-1.385,-2.84) 3(-4.155,-2.84) 4(-6.925,-2.84) 5(-9.695,-2.84) 6(0,0) 7(-2.77,0) 8(-5.54,0) 9(-8.31,0)
  round 4.76 hole 3.3: 10(-16.65,-1.42) 11(8.34,-1.42)
  silkscreen extent -19.56,-4.32 11.24,15.6, body extent -19.85,-4.33 11.47,16.38, height 12.66
DB15-VGA-FEMALE [mm]
  rect 1.4x1.4 hole 0.9: 1(0,0)
  round 1.4 hole 0.9: 2(2.29,0) 3(4.58,0) 4(6.87,0) 5(9.16,0) 6(-1.4,2.54) 7(0.89,2.54) 8(3.18,2.54) 9(5.47,2.54) 10(7.76,2.54) 11(0,5.08) 12(2.29,5.08) 13(4.58,5.08) 14(6.87,5.08) 15(9.16,5.08)
  round 5 hole 3.3: 16(-7.915,2.54) 17(17.075,2.54)
  silkscreen extent -10.83,-2.65 20.01,19.61, body extent -12.27,-1.67 21.42,60.12, height 14.3
DIOM8059 [mm] "DO-214-AB/SMC; 2 C-Bend Leads; Body 7.9 x 5.9 mm, inc. leads (LxW)"
  rect 2.4x3.3 smd: 1(-3.475,0) 2(3.475,0)
  silkscreen extent -5.07,-2.05 5.43,2.05, body extent -4.06,-2.92 4.19,2.92, height 1.42
DSO-C6-D4 [mm] "Small Outline; 6 C-Bend Leads; Body Width 3.8 mm; Pitch 1.27 mm"
  rrect50% 0.65x1.8 smd: 1(-1.27,-1.9) 2(0,-1.9) 3(1.27,-1.9) 4(1.27,1.9) 5(0,1.9) 6(-1.27,1.9)
  silkscreen extent -2.27,-2.02 2,1.95, body extent -1.86,-1.52 1.86,1.7, height 1.02
ECS-71 [mm] "SMD TUNING FORK CRYSTAL"
  rrect50% 1.2x0.6 smd: 1(-3.15,-0.45) 2(3.15,-0.45) 3(3.15,0.45) 4(-3.15,0.45)
  silkscreen extent -2.15,-0.75 2.15,0.75, body extent -3.59,-0.75 3.55,0.74, height 1.41
EDGE-PCIE-X8 [mm] "PCIe X8 PCB Edge Connector"
  rrect50% 0.7x3.2 smd paste-3.2: A1(0,-4)
  rrect50% 0.7x4.2 smd paste-4.2: A2(-1,-3.5) A3(-2,-3.5) A4(-3,-3.5) A5(-4,-3.5) A6(-5,-3.5) A7(-6,-3.5) A8(-7,-3.5) A9(-8,-3.5) A10(-9,-3.5) A11(-10,-3.5) A12(-13,-3.5) A13(-14,-3.5) A14(-15,-3.5) A15(-16,-3.5) A16(-17,-3.5) A17(-18,-3.5) A18(-19,-3.5) A19(-20,-3.5) A20(-21,-3.5) A21(-22,-3.5) A22(-23,-3.5) A23(-24,-3.5) A24(-25,-3.5) A25(-26,-3.5) A26(-27,-3.5) A27(-28,-3.5) A28(-29,-3.5) A29(-30,-3.5) A30(-31,-3.5) A31(-32,-3.5) A32(-33,-3.5) A33(-34,-3.5) A34(-35,-3.5) A35(-36,-3.5) A36(-37,-3.5) A37(-38,-3.5) A38(-39,-3.5) A39(-40,-3.5) A40(-41,-3.5) A41(-42,-3.5) A42(-43,-3.5) A43(-44,-3.5) A44(-45,-3.5) A45(-46,-3.5) A46(-47,-3.5) A47(-48,-3.5) A48(-49,-3.5) A49(-50,-3.5)
  rrect0% 0.7x4.2 smd far side paste-4.2: B1(0,-3.5) B2(-1,-3.5) B3(-2,-3.5) B4(-3,-3.5) B5(-4,-3.5) B6(-5,-3.5) B7(-6,-3.5) B8(-7,-3.5) B9(-8,-3.5) B10(-9,-3.5) B11(-10,-3.5) B12(-13,-3.5) B13(-14,-3.5) B14(-15,-3.5) B15(-16,-3.5) B16(-17,-3.5) B18(-19,-3.5) B19(-20,-3.5) B20(-21,-3.5) B21(-22,-3.5) B22(-23,-3.5) B23(-24,-3.5) B24(-25,-3.5) B25(-26,-3.5) B26(-27,-3.5) B27(-28,-3.5) B28(-29,-3.5) B29(-30,-3.5) B30(-31,-3.5) B32(-33,-3.5) B33(-34,-3.5) B34(-35,-3.5) B35(-36,-3.5) B36(-37,-3.5) B37(-38,-3.5) B38(-39,-3.5) B39(-40,-3.5) B40(-41,-3.5) B41(-42,-3.5) B42(-43,-3.5) B43(-44,-3.5) B44(-45,-3.5) B45(-46,-3.5) B46(-47,-3.5) B47(-48,-3.5) B49(-50,-3.5)
  rrect0% 0.7x3.2 smd far side paste-3.2: B17(-18,-4) B31(-32,-4) B48(-49,-4)
FGG400 [mm] "BGA, 400-Leads, Body 21x21mm, Pitch 1mm"
  round 0.5 smd: A1(-9.5,9.5) A2(-8.5,9.5) A3(-7.5,9.5) A4(-6.5,9.5) A5(-5.5,9.5) A6(-4.5,9.5) A7(-3.5,9.5) A8(-2.5,9.5) A9(-1.5,9.5) A10(-0.5,9.5) A11(0.5,9.5) A12(1.5,9.5) A13(2.5,9.5) A14(3.5,9.5) A15(4.5,9.5) A16(5.5,9.5) A17(6.5,9.5) A18(7.5,9.5) A19(8.5,9.5) A20(9.5,9.5) B1(-9.5,8.5) B2(-8.5,8.5) B3(-7.5,8.5) B4(-6.5,8.5) B5(-5.5,8.5) B6(-4.5,8.5) B7(-3.5,8.5) B8(-2.5,8.5) B9(-1.5,8.5) B10(-0.5,8.5) B11(0.5,8.5) B12(1.5,8.5) B13(2.5,8.5) B14(3.5,8.5) B15(4.5,8.5) B16(5.5,8.5) B17(6.5,8.5) B18(7.5,8.5) B19(8.5,8.5) B20(9.5,8.5) C1(-9.5,7.5) C2(-8.5,7.5) C3(-7.5,7.5) C4(-6.5,7.5) C5(-5.5,7.5) C6(-4.5,7.5) C7(-3.5,7.5) C8(-2.5,7.5) C9(-1.5,7.5) C10(-0.5,7.5) C11(0.5,7.5) C12(1.5,7.5) C13(2.5,7.5) C14(3.5,7.5) C15(4.5,7.5) C16(5.5,7.5) C17(6.5,7.5) C18(7.5,7.5) C19(8.5,7.5) C20(9.5,7.5) D1(-9.5,6.5) D2(-8.5,6.5) D3(-7.5,6.5) D4(-6.5,6.5) D5(-5.5,6.5) D6(-4.5,6.5) D7(-3.5,6.5) D8(-2.5,6.5) D9(-1.5,6.5) D10(-0.5,6.5) D11(0.5,6.5) D12(1.5,6.5) D13(2.5,6.5) D14(3.5,6.5) D15(4.5,6.5) D16(5.5,6.5) D17(6.5,6.5) D18(7.5,6.5) D19(8.5,6.5) D20(9.5,6.5) E1(-9.5,5.5) E2(-8.5,5.5) E3(-7.5,5.5) E4(-6.5,5.5) E5(-5.5,5.5) E6(-4.5,5.5) E7(-3.5,5.5) E8(-2.5,5.5) E9(-1.5,5.5) E10(-0.5,5.5) E11(0.5,5.5) E12(1.5,5.5) E13(2.5,5.5) E14(3.5,5.5) E15(4.5,5.5) E16(5.5,5.5) E17(6.5,5.5) E18(7.5,5.5) E19(8.5,5.5) E20(9.5,5.5) F1(-9.5,4.5) F2(-8.5,4.5) F3(-7.5,4.5) F4(-6.5,4.5) F5(-5.5,4.5) F6(-4.5,4.5) F7(-3.5,4.5) F8(-2.5,4.5) F9(-1.5,4.5) F10(-0.5,4.5) F11(0.5,4.5) F12(1.5,4.5) F13(2.5,4.5) F14(3.5,4.5) F15(4.5,4.5) F16(5.5,4.5) F17(6.5,4.5) F18(7.5,4.5) F19(8.5,4.5) F20(9.5,4.5) G1(-9.5,3.5) G2(-8.5,3.5) G3(-7.5,3.5) G4(-6.5,3.5) G5(-5.5,3.5) G6(-4.5,3.5) G7(-3.5,3.5) G8(-2.5,3.5) G9(-1.5,3.5) G10(-0.5,3.5) G11(0.5,3.5) G12(1.5,3.5) G13(2.5,3.5) G14(3.5,3.5) G15(4.5,3.5) G16(5.5,3.5) G17(6.5,3.5) G18(7.5,3.5) G19(8.5,3.5) G20(9.5,3.5) H1(-9.5,2.5) H2(-8.5,2.5) H3(-7.5,2.5) H4(-6.5,2.5) H5(-5.5,2.5) H6(-4.5,2.5) H7(-3.5,2.5) H8(-2.5,2.5) H9(-1.5,2.5) H10(-0.5,2.5) H11(0.5,2.5) H12(1.5,2.5) H13(2.5,2.5) H14(3.5,2.5) H15(4.5,2.5) H16(5.5,2.5) H17(6.5,2.5) H18(7.5,2.5) H19(8.5,2.5) H20(9.5,2.5) J1(-9.5,1.5) J2(-8.5,1.5) J3(-7.5,1.5) J4(-6.5,1.5) J5(-5.5,1.5) J6(-4.5,1.5) J7(-3.5,1.5) J8(-2.5,1.5) J9(-1.5,1.5) J10(-0.5,1.5) J11(0.5,1.5) J12(1.5,1.5) J13(2.5,1.5) J14(3.5,1.5) J15(4.5,1.5) J16(5.5,1.5) J17(6.5,1.5) J18(7.5,1.5) J19(8.5,1.5) J20(9.5,1.5) K1(-9.5,0.5) K2(-8.5,0.5) K3(-7.5,0.5) K4(-6.5,0.5) K5(-5.5,0.5) K6(-4.5,0.5) K7(-3.5,0.5) K8(-2.5,0.5) K9(-1.5,0.5) K10(-0.5,0.5) K11(0.5,0.5) K12(1.5,0.5) K13(2.5,0.5) K14(3.5,0.5) K15(4.5,0.5) K16(5.5,0.5) K17(6.5,0.5) K18(7.5,0.5) K19(8.5,0.5) K20(9.5,0.5) L1(-9.5,-0.5) L2(-8.5,-0.5) L3(-7.5,-0.5) L4(-6.5,-0.5) L5(-5.5,-0.5) L6(-4.5,-0.5) L7(-3.5,-0.5) L8(-2.5,-0.5) L9(-1.5,-0.5) L10(-0.5,-0.5) L11(0.5,-0.5) L12(1.5,-0.5) L13(2.5,-0.5) L14(3.5,-0.5) L15(4.5,-0.5) L16(5.5,-0.5) L17(6.5,-0.5) L18(7.5,-0.5) L19(8.5,-0.5) L20(9.5,-0.5) M1(-9.5,-1.5) M2(-8.5,-1.5) M3(-7.5,-1.5) M4(-6.5,-1.5) M5(-5.5,-1.5) M6(-4.5,-1.5) M7(-3.5,-1.5) M8(-2.5,-1.5) M9(-1.5,-1.5) M10(-0.5,-1.5) M11(0.5,-1.5) M12(1.5,-1.5) M13(2.5,-1.5) M14(3.5,-1.5) M15(4.5,-1.5) M16(5.5,-1.5) M17(6.5,-1.5) M18(7.5,-1.5) M19(8.5,-1.5) M20(9.5,-1.5) N1(-9.5,-2.5) N2(-8.5,-2.5) N3(-7.5,-2.5) N4(-6.5,-2.5) N5(-5.5,-2.5) N6(-4.5,-2.5) N7(-3.5,-2.5) N8(-2.5,-2.5) N9(-1.5,-2.5) N10(-0.5,-2.5) N11(0.5,-2.5) N12(1.5,-2.5) N13(2.5,-2.5) N14(3.5,-2.5) N15(4.5,-2.5) N16(5.5,-2.5) N17(6.5,-2.5) N18(7.5,-2.5) N19(8.5,-2.5) N20(9.5,-2.5) P1(-9.5,-3.5) P2(-8.5,-3.5) P3(-7.5,-3.5) P4(-6.5,-3.5) P5(-5.5,-3.5) P6(-4.5,-3.5) P7(-3.5,-3.5) P8(-2.5,-3.5) P9(-1.5,-3.5) P10(-0.5,-3.5) P11(0.5,-3.5) P12(1.5,-3.5) P13(2.5,-3.5) P14(3.5,-3.5) P15(4.5,-3.5) P16(5.5,-3.5) P17(6.5,-3.5) P18(7.5,-3.5) P19(8.5,-3.5) P20(9.5,-3.5) R1(-9.5,-4.5) R2(-8.5,-4.5) R3(-7.5,-4.5) R4(-6.5,-4.5) R5(-5.5,-4.5) R6(-4.5,-4.5) R7(-3.5,-4.5) R8(-2.5,-4.5) R9(-1.5,-4.5) R10(-0.5,-4.5) R11(0.5,-4.5) R12(1.5,-4.5) R13(2.5,-4.5) R14(3.5,-4.5) R15(4.5,-4.5) R16(5.5,-4.5) R17(6.5,-4.5) R18(7.5,-4.5) R19(8.5,-4.5) R20(9.5,-4.5) T1(-9.5,-5.5) T2(-8.5,-5.5) T3(-7.5,-5.5) T4(-6.5,-5.5) T5(-5.5,-5.5) T6(-4.5,-5.5) T7(-3.5,-5.5) T8(-2.5,-5.5) T9(-1.5,-5.5) T10(-0.5,-5.5) T11(0.5,-5.5) T12(1.5,-5.5) T13(2.5,-5.5) T14(3.5,-5.5) T15(4.5,-5.5) T16(5.5,-5.5) T17(6.5,-5.5) T18(7.5,-5.5) T19(8.5,-5.5) T20(9.5,-5.5) U1(-9.5,-6.5) U2(-8.5,-6.5) U3(-7.5,-6.5) U4(-6.5,-6.5) U5(-5.5,-6.5) U6(-4.5,-6.5) U7(-3.5,-6.5) U8(-2.5,-6.5) U9(-1.5,-6.5) U10(-0.5,-6.5) U11(0.5,-6.5) U12(1.5,-6.5) U13(2.5,-6.5) U14(3.5,-6.5) U15(4.5,-6.5) U16(5.5,-6.5) U17(6.5,-6.5) U18(7.5,-6.5) U19(8.5,-6.5) U20(9.5,-6.5) V1(-9.5,-7.5) V2(-8.5,-7.5) V3(-7.5,-7.5) V4(-6.5,-7.5) V5(-5.5,-7.5) V6(-4.5,-7.5) V7(-3.5,-7.5) V8(-2.5,-7.5) V9(-1.5,-7.5) V10(-0.5,-7.5) V11(0.5,-7.5) V12(1.5,-7.5) V13(2.5,-7.5) V14(3.5,-7.5) V15(4.5,-7.5) V16(5.5,-7.5) V17(6.5,-7.5) V18(7.5,-7.5) V19(8.5,-7.5) V20(9.5,-7.5) W1(-9.5,-8.5) W2(-8.5,-8.5) W3(-7.5,-8.5) W4(-6.5,-8.5) W5(-5.5,-8.5) W6(-4.5,-8.5) W7(-3.5,-8.5) W8(-2.5,-8.5) W9(-1.5,-8.5) W10(-0.5,-8.5) W11(0.5,-8.5) W12(1.5,-8.5) W13(2.5,-8.5) W14(3.5,-8.5) W15(4.5,-8.5) W16(5.5,-8.5) W17(6.5,-8.5) W18(7.5,-8.5) W19(8.5,-8.5) W20(9.5,-8.5) Y1(-9.5,-9.5) Y2(-8.5,-9.5) Y3(-7.5,-9.5) Y4(-6.5,-9.5) Y5(-5.5,-9.5) Y6(-4.5,-9.5) Y7(-3.5,-9.5) Y8(-2.5,-9.5) Y9(-1.5,-9.5) Y10(-0.5,-9.5) Y11(0.5,-9.5) Y12(1.5,-9.5) Y13(2.5,-9.5) Y14(3.5,-9.5) Y15(4.5,-9.5) Y16(5.5,-9.5) Y17(6.5,-9.5) Y18(7.5,-9.5) Y19(8.5,-9.5) Y20(9.5,-9.5)
  silkscreen extent -11.27,-10.5 10.5,10.5, body extent -10.5,-10.5 10.5,10.5, height 2.43
"FIDUCIAL ROUND" [mm] "FIDUCIAL ROUND"
  round 1.5 all layers, no hole paste-1.524 mask+1.1: 0(0,0)
  Top Layer circle w0.127: c0,0 r1.778
  Bottom Layer circle w0.127: c0,0 r1.778
FPC-XXS1VN3R [mm] "Connector; ZIF FPC 40 Position; 0.5mm Spaced Vertical Mounting"
  rrect50% 0.4x1.524 smd: 1(-9.75,-0.975) 2(-9.25,0.975) 3(-8.75,-0.975) 4(-8.25,0.975) 5(-7.75,-0.975) 6(-7.25,0.975) 7(-6.75,-0.975) 8(-6.25,0.975) 9(-5.75,-0.975) 10(-5.25,0.975) 11(-4.75,-0.975) 12(-4.25,0.975) 13(-3.75,-0.975) 14(-3.25,0.975) 15(-2.75,-0.975) 16(-2.25,0.975) 17(-1.75,-0.975) 18(-1.25,0.975) 19(-0.75,-0.975) 20(-0.25,0.975) 21(0.25,-0.975) 22(0.75,0.975) 23(1.25,-0.975) 24(1.75,0.975) 25(2.25,-0.975) 26(2.75,0.975) 27(3.25,-0.975) 28(3.75,0.975) 29(4.25,-0.975) 30(4.75,0.975) 31(5.25,-0.975) 32(5.75,0.975) 33(6.25,-0.975) 34(6.75,0.975) 35(7.25,-0.975) 36(7.75,0.975) 37(8.25,-0.975) 38(8.75,0.975) 39(9.25,-0.975) 40(9.75,0.975)
  rect 2x2.4 smd: 41(-11.55,0) 42(11.55,0)
  silkscreen extent -10.58,-2.12 -10.33,-1.88, body extent -12.12,-1.45 12.18,1.48, height 4.47
H11L1SR2VM [mil] "Recommended pad layout for surface mount leadform"
  rect 70x80 smd: 1(-100,-182.48) 2(0,-182.48) 3(100,-182.48) 4(100,182.48) 5(0,182.48) 6(-100,182.48)
  silkscreen extent -162,-187 130,137, body extent -174,-196 176,190, height 157
HDR1X2 [mm]
  rect 1.5x1.5 hole 0.9: 1(-0.01,0.007)
  round 1.5 hole 0.9: 2(2.53,0.007)
  silkscreen extent -1.28,-1.26 3.8,1.28, body extent -1.28,-1.26 3.8,1.28, height 8.41
HDR2X2 [mm]
  rect 1.5x1.5 hole 0.9: 1(0,0)
  round 1.5 hole 0.9: 2(0,2.54) 3(2.54,0) 4(2.54,2.54)
  silkscreen extent -1.27,-1.27 3.81,3.81, body extent -1.27,-1.27 3.81,3.81, height 8.41
HDR2X10 [mm]
  rect 1.5x1.5 hole 0.9: 1(0,0)
  round 1.5 hole 0.9: 2(0,2.54) 3(2.54,0) 4(2.54,2.54) 5(5.08,0) 6(5.08,2.54) 7(7.62,0) 8(7.62,2.54) 9(10.16,0) 10(10.16,2.54) 11(12.7,0) 12(12.7,2.54) 13(15.24,0) 14(15.24,2.54) 15(17.78,0) 16(17.78,2.54) 17(20.32,0) 18(20.32,2.54) 19(22.86,0) 20(22.86,2.54)
  silkscreen extent -1.27,-1.27 24.13,3.81, body extent -1.28,-1.26 24.12,3.82, height 8.38
IM03GR [mm]
  rrect50% 2x1 smd paste+0 mask+0: 1(0,0) 2(0,3.2) 3(0,5.4) 4(0,7.6) 5(-6,7.6) 6(-6,5.4) 7(-6,3.2) 8(-6,0)
  silkscreen extent -6.1,-1.5 0.1,8.8, body extent -6.79,-1.02 0.7,8.64, height 3.8
INDC3225 [mm]
  rect 1x2.5 smd: 1(-1.5,0) 2(1.5,0)
  silkscreen extent -0.6,-1.6 0.6,1.6, body extent -1.38,-1.14 1.41,1.15, height 1.78
KLD-0202 [mm]
  oval 2x4.5 hole 1 slot 3.5 at 90 deg: 1(13.7,0)
  oval 2x4 hole 1 slot 3 at 90 deg: 2(7.5,0)
  oval 4x2 hole 1 slot 3 at 0 deg: 3(10.5,-5)
  silkscreen extent 0,-4.5 13.7,4.5, body extent -0.15,-5 14.35,4.5, height 11
KME04-USBMU03A01-1 [mm] "KME04-USBMU03A01-1"
  rrect50% 2.8x0.5 smd: 1(0,0) 2(0,-0.8) 3(0,-1.6) 4(0,-2.4) 5(0,-3.2)
  rrect50% 3.5x2.05 smd: 6(0.025,3.325) 8(0.025,-6.525)
  rrect50% 4x2.05 smd: 7(-4.225,3.325) 9(-4.225,-6.525)
  round 0.9 hole 0.9 unplated: X(-2.325,-3.8) Y(-2.325,0.6)
  silkscreen extent -8.25,-4.85 2,1.65, body extent -8.22,-6.56 0.78,3.34, height 3.95
KMFCDIN76005 [mm]
  round 2.5 hole 1.3: 1(7.5,3.75) 2(0,3.75) 3(-7.5,3.75) 4(5,6.25) 5(-5,6.25) MH1(2.5,-6.25) MH2(-2.5,-6.25)
  silkscreen extent -10.5,-8.75 10.5,7.25, body extent -10.34,-8.95 10.36,7.31, height 21.4
KMRJ103-5-508-6 [mm] "5.0mm pitch terminal block, 6-way"
  round 2.1 hole 1.2: 1(-12.5,0) 2(-7.5,0) 3(-2.5,0) 4(2.5,0) 5(7.5,0) 6(12.5,0)
  silkscreen extent -15.05,-7.8 15.05,5.5, body extent -15.83,-6.4 14.91,7, height 15.3
KMRJ103-5-508-12 [mm] "5.0mm pitch terminal block, 12-way"
  round 2.1 hole 1.2: 1(-27.5,0) 2(-22.5,0) 3(-17.5,0) 4(-12.5,0) 5(-7.5,0) 6(-2.5,0) 7(2.5,0) 8(7.5,0) 9(12.5,0) 10(17.5,0) 11(22.5,0) 12(27.5,0)
  silkscreen extent -30.05,-7.8 30.05,5.5, body extent -30.7,-6.4 30.04,7, height 15.3
KSDC012551#1 [mm] "SD Card socket"
  rrect50% 1.16x2.5 smd: 1(-6.48,-12.15) 2(-3.98,-12.15) 3(-0.68,-12.15) 4(1.03,-12.15) 5(3.53,-12.15) 6(6.03,-12.15) 7(8.45,-12.15) 8(10.15,-12.15) 9(-8.98,-12.15) CD(-2.33,-12.15) WP(13.5,-12.15)
  rect 2.2x2.2 smd: GND1(14,10.05)
  rect 2.2x2.134 smd: GND2(-14,10.05)
  round 1.55 hole 1.55 unplated: MH1(12.5,12.15) MH2(-11.7,12.15)
  silkscreen extent -14.22,-11.4 14.22,17.4, body extent -14.32,-12.74 14.4,21.53, height 2.9
KSDC012551#2 [mm] "SD Card socket"
  rrect50% 1.16x2.5 smd: 1(-6.48,-12.15) 2(-3.98,-12.15) 3(-0.68,-12.15) 4(1.03,-12.15) 5(3.53,-12.15) 6(6.03,-12.15) 7(8.45,-12.15) 8(10.15,-12.15) 9(-8.98,-12.15) CD(-2.33,-12.15) WP(13.5,-12.15)
  rrect50% 1.524x3.048 smd: GND1(14,10.05) GND2(-14,10.05)
  round 1.55 hole 1.55 unplated: MH1(12.5,12.15) MH2(-11.7,12.15)
  silkscreen extent -14.22,-11.4 14.22,17.4, body extent -14.32,-12.74 14.4,21.53, height 2.9
LEAD_FREE_S [mil]
  silkscreen extent -125,-125 125,125
LOGO-ALTIUM-NEW [mil]
  silkscreen extent -211,-34 202,54
MF_SM250 [mm] "PTC Resetatable Fuse"
  rect 2.3x4.6 smd: 1(-2.323,0.127) 2(6.077,0.127)
  silkscreen extent -4.12,-2.62 7.88,2.88, body extent -2.78,-3.01 6.33,3.34, height 3.17
MINIDIN6PURPLE [mm]
  round 1.6 hole 0.9: 1(8.45,-1.25) 2(8.45,1.25) 3(8.45,-3.25) 4(8.45,3.25) 5(10.95,-3.25) 6(10.95,3.25)
  round 3.5 hole 2.3: MH1(4.7,0)
  oval 4.4x2.4 hole 0.9 slot 2.4 at 0 deg: MH2(5.45,6.905) MH3(5.45,-6.595)
  silkscreen extent -0.05,-7 12.7,7, body extent -0.1,-7.03 12.7,6.97, height 13
"NANOBOARD LOGO" [mil]
  silkscreen extent -442,-67 456,59
"NB2STR01 Blank PCB" [mil]
NETTIE-SMT2-8X8#1 [mil]
  rect 21x12 smd paste-22 mask-22: 1(-47.2,-0.24) 2(-27.2,-0.24)
NETTIE-SMT2-8X8#2 [mil]
  rect 21x12 smd paste-22 mask-22: 1(-45,0) 2(-25,0)
NETTIE-SMT2-8X8#3 [mil]
  rect 21x12 smd paste-22 mask-22: 1(-47.2,0) 2(-27.2,0)
NETTIE-SMT2-8X8#4 [mil]
  rect 21x12 smd paste-22 mask-22: 1(-45,-1.11) 2(-25,-1.11)
NETTIE-SMT2-8X8#5 [mil]
  rect 21x12 smd paste-22 mask-22: 1(-30.08,-2.56) 2(-10.08,-2.56)
NETTIE-SMT2-8X8#6 [mil]
  rect 21x12 smd paste-22 mask-22: 1(-30.08,3.07) 2(-10.08,3.07)
NETTIE-SMT2-8X8#7 [mil]
  rect 21x12 smd paste-22 mask-22: 1(-30.08,-4.49) 2(-10.08,-4.49)
NETTIE-SMT2-8X8#8 [mil]
  rect 21x12 smd paste-22 mask-22: 1(-31.22,-2.28) 2(-51.22,-2.28)
NETTIE-SMT2-8X8#9 [mil]
  rect 21x12 smd paste-22 mask-22: 1(-31.06,3.03) 2(-11.06,3.03)
NETTIE-SMT2-8X8#10 [mil]
  rect 21x12 smd paste-22 mask-22: 1(-30.08,-1.3) 2(-10.08,-1.3)
NETTIE-SMT2-8X8#11 [mil]
  rect 21x12 smd paste-22 mask-22: 1(-31.06,3.66) 2(-11.06,3.66)
NETTIE-SMT2-8X8#12 [mil]
  rect 21x12 smd paste-22 mask-22: 1(-30,-0.46) 2(-10,-0.46)
NETTIE-SMT2-8X8#13 [mil]
  rect 21x12 smd paste-22 mask-22: 1(-30,-2.14) 2(-10,-2.14)
NETTIE-SMT2-8X8#14 [mil]
  rect 21x12 smd paste-22 mask-22: 1(-30,-1.51) 2(-10,-1.51)
NETTIE-SMT2-8X8#15 [mil]
  rect 21x12 smd paste-22 mask-22: 1(-30,-1.76) 2(-10,-1.76)
NETTIE-SMT2-8X8#16 [mil]
  rect 20x12 smd paste-20 mask-4.33: 1(-30,1.39) 2(-10,1.39)
NETTIE-SMT2-8X8#17 [mil]
  rect 21x12 smd paste-22 mask-22: 1(-30,0.93) 2(-10,0.93)
NETTIE-SMT2-8X8#18 [mil]
  rect 21x12 smd paste-22 mask-22: 1(-30,-0.88) 2(-10,-0.88)
NETTIE-SMT2-8X8#19 [mil]
  rect 21x12 smd paste-22 mask-22: 1(-30,-2.39) 2(-10,-2.39)
NETTIE-SMT2-8X8#20 [mil]
  rect 21x12 smd paste-22 mask-22: 1(-40,0) 2(-20,0)
NETTIE-SMT2-8X8#21 [mil]
  rect 21x12 smd paste-22 mask-22: 1(-30,0) 2(-10,0)
NETTIE-SMT2-31X39 [mil]
  rect 40x31.5 smd paste-19.68 mask-19.68: 1(-66.57,0.24) 2(-27.2,0.24)
NETTIE-SMT2-31X51 [mil]
  rect 52x31.5 smd paste-52 mask-19.68: 1(-35.08,0.24) 2(16.1,0.24)
PERIPHERAL_BOARD_1SLOT [mil] "Outline of 2-Slot Peripheral Board"
  Top Layer region: 728.35,3228.35 653.54,3153.54 287.4,3153.54 212.6,3228.35
  Top Layer region: 0,2216.54 74.8,2291.34 74.8,2940.94 0,3015.75
  Top Layer region: 0,452.76 74.8,527.56 74.8,937.01 0,1011.81
  Top Layer region: 2440.94,2216.54 2366.14,2291.34 2366.14,2940.94 2440.94,3015.75
  Top Layer region: 2440.94,452.76 2366.14,527.56 2366.14,937.01 2440.94,1011.81
  silkscreen extent 0,0 2441,3228
PH-2 [mm]
  rect 1.5x1.5 hole 0.75: 1(0,0)
  round 1.5 hole 0.75: 2(2,0)
  silkscreen extent -2.15,-2.85 4.15,1.85, body extent -3.88,-5.28 5.91,4.33, height 6
POT-R0911G-A1 [mm]
  round 2 hole 0.9: 1(-2.5,0) 2(0,0) 3(2.5,0) 4(-2.5,-2.5) 5(0,-2.5) 6(2.5,-2.5)
  silkscreen extent -4.9,-22.3 4.5,2.3, body extent -5.73,-27.97 5.76,1.5, height 12.64
PT4812 [mm] "Transformer for Digital Audio Data Transmission"
  rrect50% 1.27x3.05 smd: 1(0,0) 2(2.54,0) 3(5.08,0) 4(7.62,0) 5(7.62,13.21) 6(5.08,13.21) 7(2.54,13.21) 8(0,13.21)
  silkscreen extent -2.22,1.52 9.84,11.69, body extent -2.28,-0.29 9.78,13.24, height 8.86
QFN50P800X800_HS-57 [mm] "Quad Flat No Lead; 56 Terminals; Body 8 x 8 mm; Pitch 0.5 mm, Punch Version"
  rrect50% 0.305x0.86 smd mask+0.051: 1(-3.25,-3.92) 14(3.25,-3.92) 29(3.25,3.92) 42(-3.25,3.92)
  rrect50% 0.305x0.86 smd mask+0.038: 2(-2.75,-3.92) 3(-2.25,-3.92) 4(-1.75,-3.92) 5(-1.25,-3.92) 6(-0.75,-3.92) 7(-0.25,-3.92) 8(0.25,-3.92) 9(0.75,-3.92) 10(1.25,-3.92) 11(1.75,-3.92) 12(2.25,-3.92) 13(2.75,-3.92) 30(2.75,3.92) 31(2.25,3.92) 32(1.75,3.92) 33(1.25,3.92) 34(0.75,3.92) 35(0.25,3.92) 36(-0.25,3.92) 37(-0.75,3.92) 38(-1.25,3.92) 39(-1.75,3.92) 40(-2.25,3.92) 41(-2.75,3.92)
  rrect50% 0.86x0.305 smd mask+0.051: 15(3.92,-3.25) 28(3.92,3.25) 43(-3.92,3.25) 56(-3.92,-3.25)
  rrect50% 0.86x0.305 smd mask+0.038: 16(3.92,-2.75) 17(3.92,-2.25) 18(3.92,-1.75) 19(3.92,-1.25) 20(3.92,-0.75) 21(3.92,-0.25) 22(3.92,0.25) 23(3.92,0.75) 24(3.92,1.25) 25(3.92,1.75) 26(3.92,2.25) 27(3.92,2.75) 44(-3.92,2.75) 45(-3.92,2.25) 46(-3.92,1.75) 47(-3.92,1.25) 48(-3.92,0.75) 49(-3.92,0.25) 50(-3.92,-0.25) 51(-3.92,-0.75) 52(-3.92,-1.25) 53(-3.92,-1.75) 54(-3.92,-2.25) 55(-3.92,-2.75)
  Top Layer region: -2.75,2.75 2.75,2.75 2.75,-2.75 -2.75,-2.75
  silkscreen extent -4.05,-4.83 4.05,4.05, body extent -4.32,-4.24 4.26,4.28, height 0.55
RESC1005-STAR [mm] "Chip Inductor 1005"
  rect 0.575x0.6 smd: 1(-0.538,0) 2(0.538,0)
  silkscreen extent -0.05,-0.38 0.05,0.38, body extent -0.71,-0.25 0.72,0.26, height 0.25
RESC2012-STAR [mm] "0805 Resistor SMD - Startronics"
  rect 1x1.25 smd: 1(-1,0) 2(1,0)
  silkscreen extent -0.4,-1 0.4,1, body extent -1.03,-0.54 1.07,0.57, height 0.25
RESC3216 [mm]
  rect 1.6x1.8 smd: 1(-1.4,0) 2(1.4,0)
  silkscreen extent -0.3,-0.8 0.3,0.8, body extent -1.33,-0.81 1.37,0.85, height 0.55